# Altium PCB Kasli-DIOT.PCBDOC (part 14 of 23)
Units mm, origin at the board's own origin, x right, y up, seen from the top; angles counter-clockwise.
Board outline 222.9 x 100 mm, 10 copper layers (TopLayer, Layer 2, Layer 3, Layer 4, Layer 5, Layer 6, Layer 7, layer 8, Layer 9, BottomLayer), stack 1.564 mm thick; 977 components, 900 nets, 4676 pads, 2725 vias.
Unrouted connection lines stored in the file: 17.
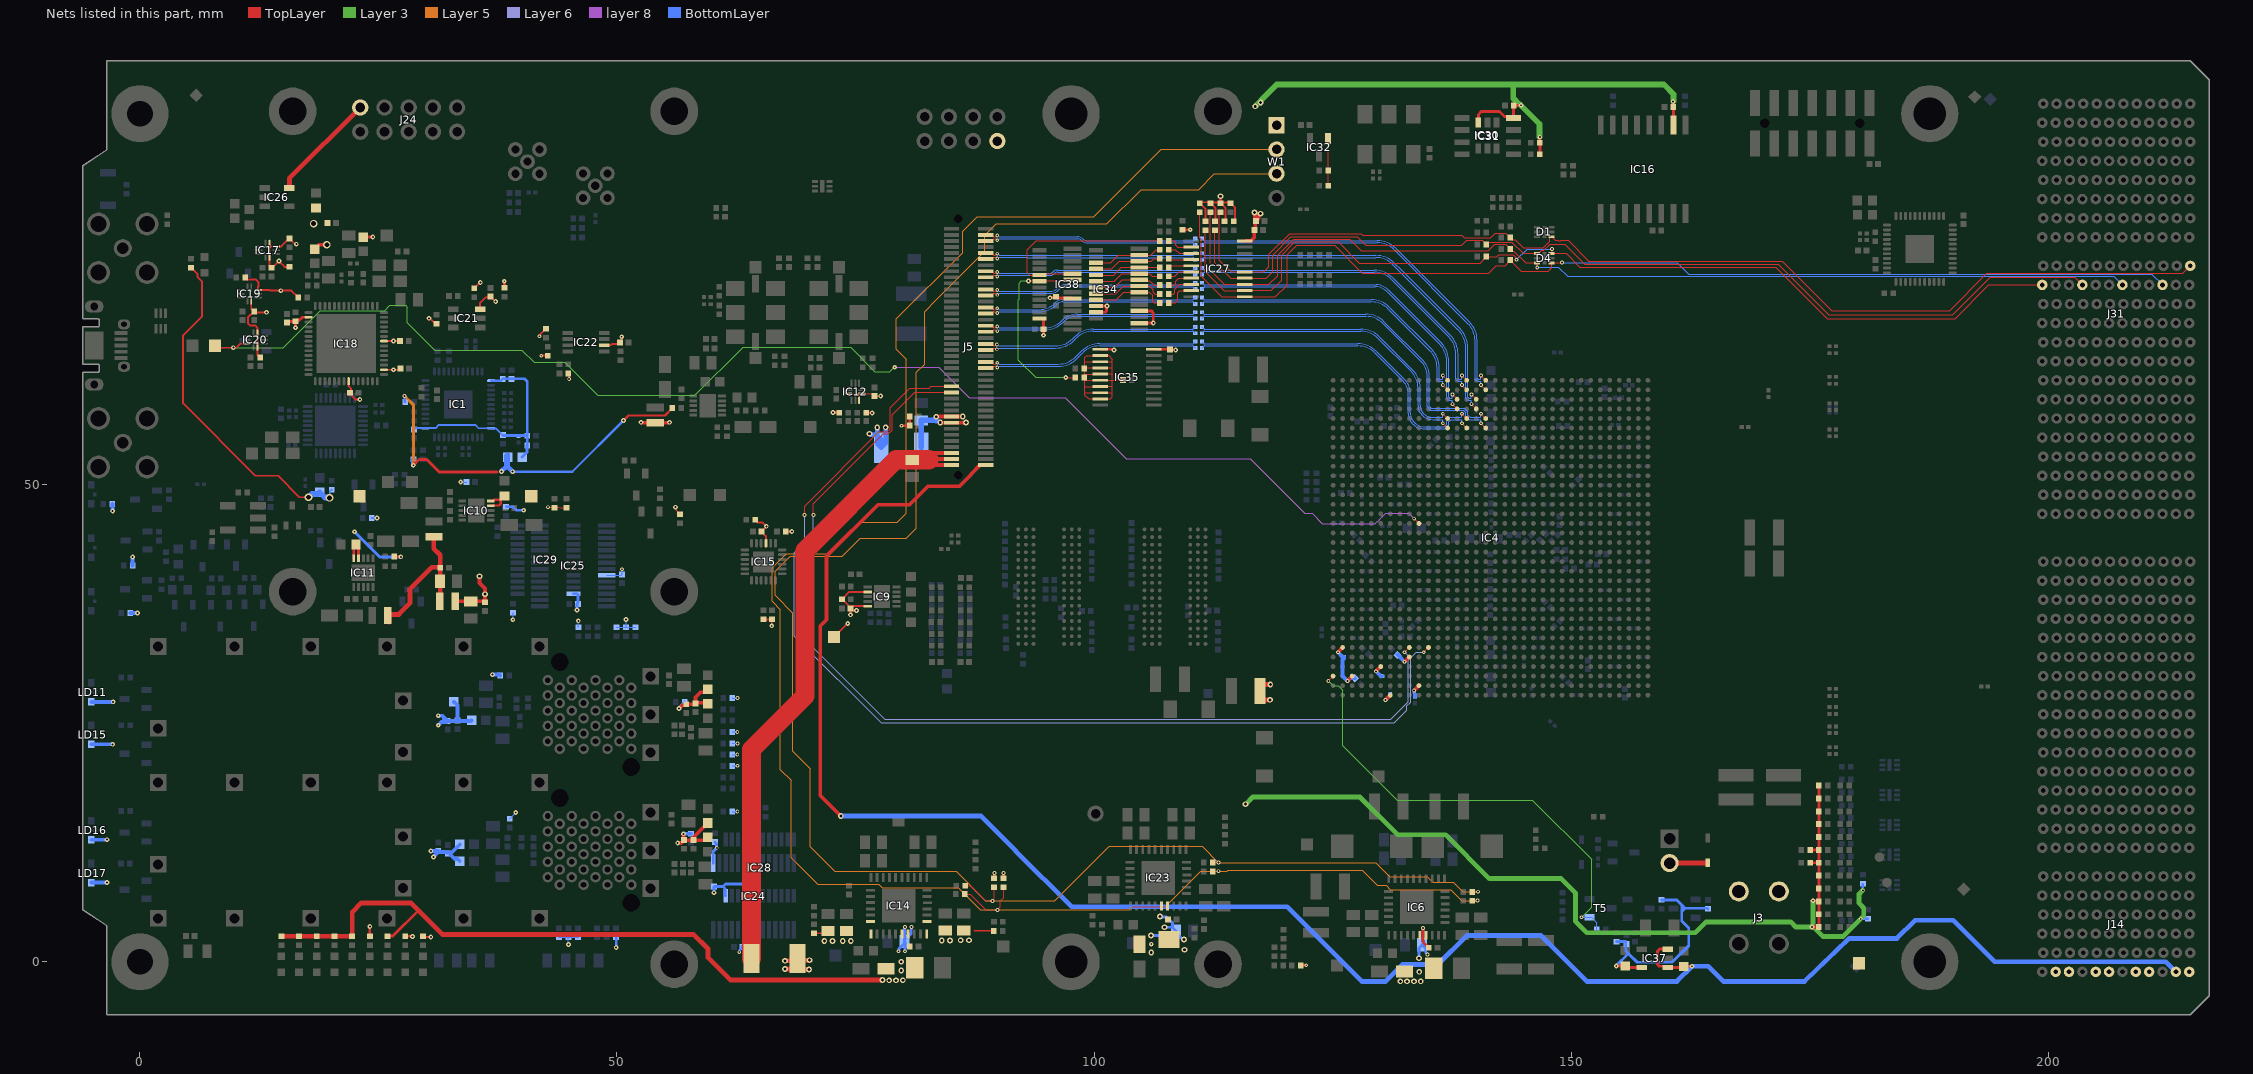
[diagram p20: the nets of this part, all layers, seen from the top]

## Via types
v1: diameter 0.4, hole 0.2, TopLayer to BottomLayer, tented both sides, 1723 vias
v2: diameter 0.5, hole 0.2, TopLayer to BottomLayer, tented both sides, 524 vias
v3: diameter 0.6, hole 0.3, TopLayer to BottomLayer, tented both sides, 172 vias
v4: diameter 0.6, hole 0.3, TopLayer to BottomLayer, 113 vias
v5: diameter 0.5, hole 0.2, TopLayer to BottomLayer, 107 vias
v6: diameter 0.4, hole 0.2, TopLayer to BottomLayer, 67 vias
v7: diameter 0.5, hole 0.25, TopLayer to BottomLayer, tented both sides, 12 vias
v8: diameter 0.8, hole 0.5, TopLayer to BottomLayer, tented both sides, 7 vias

## Nets (pads, with @x,y where several pads share a name; then routed paths per layer and width w, separated by ;. In a path a pad name is that pad's centre, name@x,y a point inside that pad or via, vN(x,y) a via of type N, cw(c..) or ccw(c..) an arc to the next point about the centre after c; other vN are vias at no path point) (continued)
P3V3: C28.2 C96.2 C109.2 C160.2 C161.2 C172.2 C178.2 C185.2 C186.2 C192.2 C193.2 C197.2 C198.2 C221.2 C227.2 C244.2 C259.2 C266.2 C267.2 C276.2 C292.2 C298.2 C305.2 C306.2 C307.2 C312.2 C315.2 C316.2 C317.2 C318.2 C389.2 C390.2 C427.2 F4.1 IC4.AJ2 IC4.AK9 IC4.AL6 IC4.AM3 IC4.AN10 IC4.AP7 IC9.7 IC9.10 IC12.1 IC12.7 IC12.10 IC14.22 IC14.23 IC15.21 IC16.2 IC22.2 IC24.9 IC24.15 IC25.9 IC27.20 IC28.21 IC28.24 IC29.24 IC30.6 IC31.8 IC34.9 IC34.16 IC34.18 IC35.1 IC35.20 IC38.2 IC38.3 IC38.24 L3.1 L19.1 L20.1 L21.1 L30.1 L31.1 L32.1 L33.1 L34.1 LD11.2 LD15.2 LD16.2 LD17.2 R11.2 R20.2 R44.2 R55.2 R62.2 R66.2 R73.2 R75.2 R76.2 R77.2 R78.2 R79.2 R81.2 R83.2 R84.2 R85.2 R87.2 R92.2 R127.2 R131.1 R132.1 R133.2 R134.2 R135.2 R136.2 R137.2 R138.2 R144.2 R145.2 R148.2 R149.2 R151.2 R158.2 R159.2 R174.2 R176.2 R177.2 R178.2 R179.2 R180.2 R181.2 R182.2 R183.2 R184.2 R185.2 R186.2 R187.2 R188.2 R189.2 R190.2 R191.2 R192.2 R209.2 R212.2 R217.2 R218.2 R219.2 R225.2 R226.2 R244.2 R245.2 R264.2 R265.2 R293.2 R294.2 R295.2 R296.2 R297.2 R300.2 TP7.1 TP31.1 W1.1 | length 322.7
  TopLayer w0.125: v1(42.765,47.653) 43.445,47.653 43.461,47.669 43.897,47.669 43.986,47.58 R190.2@44.686,47.58 ; v2(56.139,47.654) 56.189,47.603 56.189,47.335 56.36,47.164 56.36,47.144 56.587,46.917 R151.2@56.607,46.917 ; IC12.7@74.286,59.55 IC12.1@75.421,59.55 ; IC12.10@75.386,58.85 75.386,59.515 IC12.1@75.421,59.55 ; v2(77.638,59.302) 77.234,59.302 76.986,59.55 IC12.1@75.636,59.55 IC12.1@75.421,59.55
  TopLayer w0.15: R62.2@70.638,3.01 C390.2@71.888,3.01
  TopLayer w0.2: IC22.2@48.661,64.625 49.355,64.625 49.492,64.762 50.223,64.762 50.492,65.031 v2@50.492,65.467 ; R148.2@64.471,46.341 64.471,46.321 64.661,46.131 64.696,46.131 64.778,46.048 65.254,46.048 v5(65.656,45.645) 65.656,45.609 C198.2@65.139,45.092 65.611,44.619 IC15.21@65.611,43.879 IC15.21@65.63,43.898 ; R176.2@65.375,35.897 R177.2@66.261,35.897 66.22,35.856 v2(66.22,35.221) ; R149.2@67.712,45.084 67.729,45.101 v2(68.326,45.101) ; C390.2@71.888,3.01 C390.2@72.113,3.235 ; TP7.1@72.74,34.035 74.155,35.45 v5(74.186,35.45) ; v2(74.479,36.367) 74.479,37.023 C172.2@74.48,37.025 ; v2@75.153,36.867 v2(75.11,36.823) 74.682,36.823 C172.2@74.48,37.025 ; IC9.10@76.28,37.275 76.248,37.308 74.763,37.308 C172.2@74.48,37.025 ; IC9.7@76.28,38.775 74.36,38.775 R127.2@73.585,38 74.48,37.105 C172.2@74.48,37.025 ; R192.2@111.684,77.629 111.684,78.954 111.105,79.533 R212.2@111.085,79.533 111.166,79.614 112.113,79.614 R191.2@112.194,79.533 112.26,79.599 113.179,79.599 R181.2@113.245,79.533 ; R191.2@112.214,79.533 112.731,79.016 112.731,77.688 R182.2@112.672,77.629 ; R180.2@113.659,77.629 113.769,77.739 113.769,79.044 113.47,79.343 113.435,79.343 R181.2@113.245,79.533 ; R178.2@114.647,77.629 114.796,77.778 114.796,79.043 114.306,79.533 R179.2@114.286,79.533 114.21,79.609 113.322,79.609 R181.2@113.245,79.533
  TopLayer w0.25: R87.2@24.094,2.667 v2(24.094,3.705) ; R55.2@27.805,2.667 v2(28.573,2.667) ; R44.2@29.661,2.667 29.728,2.6 v2(30.486,2.6) ; R297.2@109.288,76.726 110.08,76.726 v2(110.087,76.733)
  TopLayer w0.254: v2(72.636,57.575) 72.648,57.563 73.279,57.563 R244.2@73.291,57.55 ; R245.2@76.094,57.563 R245.2@76.106,57.55 76.736,57.55 v2(76.749,57.538) ; v1(79.814,56.189) 79.819,56.194 80.685,56.194 R66.2@80.691,56.2 R225.2@80.691,57.14 ; IC35.1@100.661,64.204 101.965,64.204 102.036,64.133 v2(102.103,64.133) ; IC35.20@106.411,64.203 C186.2@107.962,64.203 ; C186.2@107.962,64.203 107.993,64.171 108.53,64.171 v2(108.561,64.14)
  TopLayer w0.3: R159.2@89.536,8.775 89.55,8.789 89.55,9.286 v1(89.563,9.3) ; v1(90.513,9.3) 90.522,9.292 90.522,8.783 R158.2@90.53,8.775 ; IC38.24@94.297,67.436 94.617,67.436 94.692,67.361 C192.2@94.692,66.302 94.693,66.301 v2(94.694,65.681) v2(94.694,65.681) ; v2@95.311,69.636 95.347,69.636 v2(95.381,69.602) 95.419,69.64 95.962,69.64 C427.2@96.035,69.713 96.171,69.576 97.707,69.576 IC34.9@97.747,69.536 ; IC38.2@100.197,68.086 101.173,68.086 101.311,68.223 101.311,68.704 v2@101.345,68.739 ; IC38.3@100.197,68.736 100.201,68.739 v2@101.345,68.739 ; v2(101.349,68.743) v2@101.345,68.739 ; IC34.16@104.747,66.936 104.758,66.946 106.206,66.946 v2(106.216,66.956) 106.216,68.019 105.999,68.236 IC34.18@104.747,68.236 ; R181.2@113.245,79.533 113.252,79.54 113.252,80.245 v3(113.258,80.251) ; IC30.6@140.286,87.975 140.286,88.828 140.59,89.132 142.516,89.132 143.043,88.605 143.811,88.605 IC31.8@143.961,88.455 143.982,88.476 143.982,89.614 143.878,89.719 C307.2@143.856,89.719 ; C307.2@143.877,89.774 143.883,89.781 v2(144.761,89.781) ; R264.2@146.731,84.65 v2(146.732,86.438) ; v2(160.71,90.172) 160.714,90.168 160.714,89.59 160.727,89.577 160.727,87.734 IC16.2@160.736,87.725 ; R295.2@175.074,10.383 R79.2@175.986,10.383 ; R296.2@175.081,11.731 R73.2@175.986,11.731 ; v2(175.261,3.65) 175.266,3.645 175.981,3.645 R78.2@175.986,3.641 R75.2@175.986,6.338 ; v5(175.361,6.4) 175.38,6.381 175.943,6.381 R75.2@175.986,6.338 ; R85.2@175.986,18.473 R92.2@175.986,17.124 R83.2@175.986,15.776 R84.2@175.986,14.428 R77.2@175.986,13.079 R73.2@175.986,11.731 ; R75.2@175.986,6.338 R76.2@175.986,7.686 R81.2@175.986,9.034 R79.2@175.986,10.383 ; R79.2@175.986,10.383 R73.2@175.986,11.731
  TopLayer w0.4: v2(52.511,56.55) 52.538,56.55 52.588,56.5 L3.1@54.011,56.5 55.434,56.5 55.484,56.55 v2(55.511,56.55) ; v2(56.361,12.45) 56.38,12.469 56.73,12.469 C244.2@57.011,12.75 ; v2(56.511,26.55) 56.851,26.89 57.151,26.89 C259.2@57.261,27 57.961,27 C276.2@58.186,27.225 ; v2(56.965,13.418) 56.984,13.399 56.984,12.777 C244.2@57.011,12.75 ; C160.2@58.011,12.65 C160.2@58.011,12.75 ; C276.2@58.235,27.093 58.235,27.727 58.76,28.252 59.213,28.252 L31.1@59.511,28.55 ; C276.2@58.261,27.15 59.411,27.15 L30.1@59.511,27.05 ; L19.1@59.511,13.05 59.211,12.75 C160.2@58.011,12.75 ; L34.1@59.511,14.55 58.011,13.05 C160.2@58.011,12.75 ; IC27.20@115.947,75.561 116.447,75.561 116.796,75.909 116.796,76.658 116.91,76.772 116.91,77.61 116.947,77.61 C292.2@116.975,77.638 ; v3(116.832,78.536) 116.87,78.498 116.87,77.742 C292.2@116.975,77.638 ; v3(117.461,78.421) 117.336,78.421 117.265,78.35 117.265,77.928 C292.2@116.975,77.638 ; v1(125.561,32.45) IC4.AJ2@126.061,32.95 ; v1(126.561,29.45) IC4.AM3@127.061,29.95 ; v1(129.561,30.45) IC4.AL6@130.061,30.95 ; v1(130.561,27.45) IC4.AP7@131.061,27.95 ; v1(132.561,31.45) IC4.AK9@133.061,31.95 ; v1(133.561,28.45) IC4.AN10@134.061,28.95 ; C244.2@57.011,12.75 C160.2@58.011,12.75
  TopLayer w0.5: C312.2@117.661,27.802 117.661,27.53 117.736,27.455 v3(118.436,27.455) ; C312.2@117.661,28.652 117.661,28.994 117.736,29.068 v3(118.482,29.068)
  Layer 3 w0.5: v3(115.886,16.525) 116.636,17.275 127.875,17.275 131.825,13.325 136.848,13.325 141.443,8.73 148.961,8.73 150.464,7.228 150.464,4.257 151.673,3.047 163.028,3.047 164.156,4.175 173.03,4.175 173.555,3.65 v2(175.261,3.65) 175.425,3.65 176.411,2.664 178.527,2.664 v1@180.369,4.506 ; v2@175.261,3.677 175.361,3.777 v5(175.361,6.4) ; v1(180.372,4.506) 180.695,4.829 180.695,5.641 180.199,6.138 180.199,7.108 v1(180.586,7.495)
  Layer 3 w0.6: v3(116.903,89.67) 116.916,89.67 117.307,90.061 v3(117.464,90.061) 117.464,90.253 119.161,91.95 143.941,91.95 ; v2(146.732,86.438) 146.694,86.476 146.694,87.81 144.644,89.86 144.601,89.86 143.941,90.52 143.941,91.95 ; v2(160.71,90.172) 160.737,90.199 160.737,90.947 159.734,91.95 143.941,91.95
  BottomLayer w0.095: v2(33.621,50.29) C298.2@34.271,50.29
  BottomLayer w0.125: R174.2@38.761,15.02 v2(39.391,15.65) ; v2(39.08,35.86) 39.116,35.895 R132.1@39.116,36.61 ; R187.2@43.913,2.585 R144.2@44.913,2.585 ; v2(44.913,1.805) R144.2@44.913,2.585 ; R188.2@45.913,2.585 R144.2@44.913,2.585 ; R138.2@45.947,35.065 v2(45.947,35.745) ; IC25.9@48.908,40.525 50.445,40.525 C227.2@50.52,40.6 50.536,40.616 v1(50.536,41.15) ; R186.2@49.947,35.065 R133.2@50.947,35.065 ; v2(50.947,35.87) R133.2@50.947,35.065 ; R185.2@51.947,35.065 R133.2@50.947,35.065 ; R217.2@62.076,15.776 62.102,15.75 v1(62.611,15.75) ; R145.2@62.076,20.528 62.102,20.553 v1(62.622,20.553) ; R183.2@62.076,21.716 62.085,21.725 v1(62.611,21.725) ; R134.2@62.076,22.904 62.08,22.9 v1(62.636,22.9) ; R184.2@62.076,24.092 62.084,24.1 v1(62.611,24.1) ; R135.2@62.076,27.656 62.082,27.65 v1(62.636,27.65)
  BottomLayer w0.2: R209.2@24.281,46.5 24.306,46.525 v5(24.836,46.525)
  BottomLayer w0.25: v2(49.913,1.509) R218.2@49.913,2.585 ; v1(180.372,4.506) 181.097,4.506 R293.2@181.111,4.519 ; v1(180.586,7.495) R294.2@180.586,8.163
  BottomLayer w0.254: v1(62.811,1.009) 62.839,1.037 62.839,1.256 63.091,1.509 63.091,1.63 63.213,1.63 63.335,1.752 63.335,1.9 63.336,1.901 IC24.9@63.336,3.35
  BottomLayer w0.3: IC29.24@45.458,38.575 45.823,38.575 45.898,38.5 C305.2@45.898,37.717 ; v2(45.798,36.867) C305.2@45.798,37.517 ; v2(56.511,26.55) 56.549,26.588 56.549,26.693 57.086,27.23 R136.2@57.086,27.25 ; IC24.15@60.086,10.35 60.086,11.575 v1(60.461,11.95) 60.461,11.977 60.411,12.027 60.411,12.419 60.271,12.559 R131.1@60.263,12.559 ; v2(60.161,7.25) 60.174,7.263 60.174,7.863 C306.2@60.186,7.875 ; C306.2@60.186,7.9 61.111,7.9 ; IC28.24@61.386,6.925 61.311,7 61.311,7.7 61.111,7.9 ; IC28.21@63.336,6.925 63.33,6.931 63.33,7.906 63.066,8.17 61.381,8.17 61.111,7.9
  BottomLayer w0.4: LD17.2@-5.1,8.3 v2(-3.464,8.3) ; LD16.2@-5.1,12.8 v2(-3.464,12.8) ; LD15.2@-5.1,22.8 v2(-2.864,22.8) ; LD11.2@-5.1,27.25 v2(-2.814,27.25) ; R20.2@-2.898,48.002 -2.897,48.001 -2.897,47.311 -2.865,47.28 v2(-2.865,47.253) ; R226.2@-1.019,36.55 v2(-0.264,36.55) ; R11.2@-0.769,41.55 v2(-0.769,42.42) ; v2(30.486,11.625) 30.513,11.625 30.538,11.6 C267.2@31.261,11.6 ; v2(30.761,11) 31.151,11.39 31.151,11.49 C267.2@31.261,11.6 ; v2(31.261,24.8) 31.601,25.14 31.801,25.14 ; v2(31.261,25.8) 31.711,25.8 C178.2@32.261,25.25 ; 31.861,25.55 31.861,25.2 31.801,25.14 ; C266.2@32.261,11.46 32.151,11.46 32.116,11.495 31.366,11.495 C267.2@31.261,11.6 ; C266.2@32.261,11.475 32.686,11.475 L32.1@33.511,12.3 ; C266.2@32.542,11.475 32.542,11.228 32.995,10.775 33.286,10.775 L33.1@33.511,10.55 ; L20.1@32.911,27.25 33.274,26.887 C185.2@33.274,25.288 ; L21.1@34.761,25.3 34.711,25.25 C178.2@32.261,25.25 ; v2(36.961,30.1) 37.681,30.1 R137.2@37.761,30.02 ; v2@56.938,13.418 v2(56.965,13.418) 56.966,13.417 R219.2@57.761,13.416 R219.2@57.761,13.416 ; v1(125.561,32.45) 126.061,31.95 C318.2@126.186,31.95 ; C318.2@126.211,31.95 126.211,31.807 126.061,31.657 126.061,29.95 v1(126.561,29.45) 126.829,29.718 C96.2@127.343,29.718 ; v1(129.561,30.45) 130.086,29.925 C316.2@130.211,29.925 ; v1(130.561,27.45) 131.036,27.925 C315.2@131.036,28.05 ; C109.2@131.796,32.215 v1(132.561,31.45) ; v1(133.561,28.45) 133.561,28.153 133.661,28.053 C317.2@133.661,27.8 ; 31.801,25.14 32.151,25.14 C178.2@32.261,25.25
  BottomLayer w0.5: v4(76.461,55.35) 76.488,55.35 76.588,55.25 77.186,55.25 F4.1@77.286,55.15 ; v4(77.286,56) F4.1@77.286,55.15 ; v4(78.161,56.025) 78.161,54.375 F4.1@77.686,53.9 ; F4.1@77.286,55.15 77.286,54.3 F4.1@77.686,53.9 ; F4.1@77.286,55.15 77.686,54.75 F4.1@77.686,53.9
  other v2: 50.492,65.517
  other v3: 71.735,2.175 72.585,2.175 73.66,2.175 74.51,2.175
P3V3_ADCLK: C190.2 C191.2 C234.2 C239.2 C241.2 C242.2 C243.2 IC1.12 IC1.34 IC1.44 L29.1 | length 24.6
  BottomLayer w0.2: C191.2@28.736,55.8 28.883,55.947 30.983,55.947 31.311,56.275 35.136,56.275 35.483,55.928 IC1.44@36.811,55.928 36.818,55.921 37.315,55.921 C190.2@38.036,55.2
  BottomLayer w0.254: IC1.34@36.811,60.928 37.837,60.928 C243.2@38.021,61.112
  BottomLayer w0.3: C243.2@38.021,61.112 C234.2@38.961,61.112 40.299,61.112 40.596,60.815 C239.2@40.596,55.142 ; C190.2@38.036,55.2 38.065,55.171 40.567,55.171 C239.2@40.596,55.142 ; L29.1@40.061,52.9 40.578,53.417 C241.2@40.578,54.19 ; C241.2@40.596,54.208 C239.2@40.596,55.142
P3V3_fused: C425.2 F4.2 J5.64 J5.66 | length 9.9
  TopLayer w0.4: v4(83.47,57.14) 83.477,57.148 J5.64@85.061,57.148 86.234,57.148 v4(86.236,57.15) ; v4(83.886,56.525) 83.898,56.513 J5.66@85.061,56.513 86.573,56.513 v4(86.586,56.525)
  BottomLayer w0.6: F4.2@81.886,53.9 C425.2@81.886,56.75 81.898,56.763 83.424,56.763 83.461,56.725
P3V3_LDO1: C17.2 IC11.9 IC11.10 L2.2 R15.2 R22.1 R250.2 TP20.1 | length 45.8
  TopLayer w0.2: R15.2@5.355,72.746 5.375,72.746 6.038,72.083 6.038,71.773 6.511,71.3 6.511,67.669 4.511,65.669 4.511,58.54 12.101,50.95 14.468,50.95 16.718,48.7 v8@17.281,48.7
  TopLayer w0.3: IC11.10@22.411,42.287 22.411,43.495 C17.2@22.656,43.74 ; C17.2@22.563,43.74 22.888,43.365 22.888,43.244 ccw(c22.967,43.245) 22.911,43.189 22.911,42.537 IC11.9@22.911,42.287 ; R250.2@26.634,42.465 26.642,42.458 27.333,42.458 v2(27.341,42.45)
  BottomLayer w0.2: v8(19.861,48.625) 19.892,48.656 19.892,49.316 20.082,49.506 R22.1@20.102,49.506
  BottomLayer w0.3: v2(22.483,45.084) 25.117,42.45 v2(27.341,42.45)
  BottomLayer w0.6: v8(17.661,48.7) 17.715,48.7 18.041,49.026 18.632,49.026 L2.2@18.832,49.226 19.395,48.663 19.823,48.663 v8(19.861,48.625)
P3V3_LDO2: C279.2 IC10.9 IC10.10 L29.2 R4.2 R54.1 R242.2 R254.2 TP25.1 | length 46.6
  TopLayer w0.25: IC10.9@36.761,47.8 36.786,47.825 37.639,47.825 37.797,47.983 37.797,48.442 37.153,48.442 37.011,48.3 IC10.10@36.761,48.3 ; v2(50.686,56.75) 51.196,57.26 55.021,57.26 55.791,58.03 R54.1@55.791,58.05
  TopLayer w0.3: v2(28.652,52.051) 29.251,52.65 30.061,52.65 31.361,51.35 37.43,51.35
  Layer 5 w0.3: v1(27.736,59.3) 28.652,58.384 v2(28.652,52.051)
  BottomLayer w0.25: v1(27.736,59.3) 27.764,59.272 27.764,58.703 R4.2@27.791,58.675 ; R254.2@38.386,47.695 38.397,47.684 39.116,47.684 39.448,47.352 40.203,47.352 v2(40.221,47.334) ; v2(39.061,51.375) 45.311,51.375 v2(50.686,56.75)
  BottomLayer w0.5: v2(28.652,52.051) 28.652,52.671 R242.2@28.661,52.68 ; v2(37.886,51.4) 38.386,51.9 38.386,53.025 38.511,53.15 38.536,53.125 38.536,51.9 v2(39.061,51.375)
P3V3_MP: C397.2 C420.2 IC37.5 R93.2 R258.2 R259.2 | length 24.6
  TopLayer w0.3: v2(154.742,-0.435) C420.2@155.671,-0.435 155.821,-0.585 IC37.5@157.421,-0.585
  BottomLayer w0.3: v2@154.742,-0.409 155.976,0.825 ; R93.2@154.771,2.129 155.726,2.129 155.736,2.139 155.736,1.15 156.018,0.868 156.146,0.74 156.936,-0.05 160.597,-0.05 162.336,1.689 162.336,3.556 161.614,4.278 161.614,5.27 ; R259.2@159.486,6.495 161.083,6.495 161.614,5.964 ; R258.2@164.341,5.538 164.262,5.617 161.961,5.617 ; 161.614,5.27 161.961,5.617 ; 161.614,5.27 161.614,5.964 ; 161.614,5.964 161.961,5.617
P3V3_USB: C205.2 C213.2 C214.2 C215.2 C216.2 C222.2 C223.2 C224.2 C293.2 C409.2 IC17.1 IC17.7 IC17.10 IC18.16 IC18.36 IC18.44 IC18.50 IC19.7 IC19.10 IC20.1 IC20.7 IC21.6 IC26.5 J24.9 L24.1 L25.1 R194.2 R195.2 R196.2 R197.2 R198.2 R202.2 R203.2 R204.2 R206.2 R207.2 R241.1 | length 55.5
  TopLayer w0.2: R194.2@11.031,71.75 11.031,71.73 11.221,71.54 11.298,71.54 11.338,71.5 12.161,71.5 12.411,71.25 12.411,70.784 12.366,70.739 IC19.10@12.366,70.415 13.598,70.415 13.663,70.35 v2(14.761,70.35) 15.868,70.35 R197.2@16.584,69.634 ; IC19.7@11.666,69.315 11.666,68.387 C215.2@11.974,68.079 ; C214.2@12.609,63.253 12.301,63.561 IC20.7@12.301,64.489 IC20.1@12.301,65.839 12.301,66.46 12.061,66.7 11.52,66.7 11.334,66.886 11.334,67.581 11.428,67.675 11.428,67.699 11.545,67.816 11.613,67.816 11.764,67.967 11.764,67.969 11.874,68.079 C215.2@11.974,68.079 ; v2(13.26,68.079) C215.2@11.974,68.079 ; IC17.1@13.571,75.237 IC17.7@13.571,73.887 13.571,72.959 C293.2@13.783,72.748 ; IC17.1@13.59,74.987 IC17.10@14.271,74.987 14.825,74.987 R195.2@15.657,75.819 16.34,75.136 16.386,75.183 v2(16.386,75.225) ; C293.2@13.786,72.751 13.996,72.961 14.072,72.961 v2(14.561,73.45) 15.164,72.847 R196.2@15.657,72.847 ; IC18.36@21.876,60.858 21.876,60.335 22.111,60.1 22.111,59.55 22.221,59.44 22.221,59.34 22.625,58.936 v2(23.042,58.936) ; IC18.44@25.576,62.058 v2(26.579,62.058) C224.2@27.328,62.058 ; IC18.50@25.576,65.058 26.575,65.058 v2(26.579,65.062) C222.2@27.372,65.062 ; v2@30.342,67.506 R202.2@31.014,66.833 ; R203.2@35.036,70.52 35.036,70.6 35.645,71.209 v2(35.678,71.209) ; IC21.6@35.661,68.4 35.631,68.43 35.631,69.04 36.247,69.656 36.646,69.656 C216.2@36.74,69.75 37.278,69.212 v2(37.283,69.212) ; v1(41.861,65.575) 41.861,65.651 42.555,66.345 R206.2@42.575,66.345 R206.2@42.545,66.375 ; v1(42.061,63.525) 42.074,63.538 42.733,63.538 R207.2@42.746,63.551 ; R241.1@44.913,61.683 44.95,61.647 44.95,61.136 v1(44.986,61.1)
  TopLayer w0.3: C223.2@15.403,67.125 16.285,67.125 R198.2@16.292,67.132 ; v2(16.292,66.459) R198.2@16.292,67.132 ; IC18.16@17.676,67.558 17.019,67.558 16.733,67.272 16.432,67.272 R198.2@16.292,67.132 ; L24.1@23.404,75.972 v2(24.408,75.972) ; v2(38.181,71.34) 38.196,71.325 38.196,70.627 R204.2@38.211,70.612
  TopLayer w0.4: v8(19.592,75.161) 18.735,75.161 L25.1@18.324,74.75 ; L25.1@18.324,74.75 18.276,74.75 L25.1@18.324,74.702 L25.1@18.324,74.75
  TopLayer w0.5: IC26.5@15.661,81.1 15.661,82.121 J24.9@23.088,89.548
  other v2: 30.286,67.45
  other v8: 18.197,77.381
P5V0_CLK: C3.2 C199.2 C383.2 C384.2 IC14.1 IC14.32 L1.1 R156.2 | length 8.1
  TopLayer w0.15: 87.461,3.3 87.511,3.25 R156.2@89.491,3.25
  TopLayer w0.4: L1.1@33.036,37.788 C3.2@34.661,37.788 36.229,37.788 36.171,37.788 36.161,37.798 36.161,39.125 35.593,39.693 v3@35.593,40.356
  other v3: 84.04,2.241 84.901,2.241 86.018,2.26 86.905,2.26 36.161,38.537 35.591,40.417
P5V0_CLKa: C18.2 C38.2 L1.2 L23.1 L35.1 | length 16.3
  TopLayer w0.5: L23.1@25.83,36.418 27.14,36.418 28.298,37.576 28.298,39.075 30.593,41.37 C38.2@31.41,41.37 ; L23.1@25.961,36.287 26.111,36.137 L23.1@26.111,35.625 ; L35.1@30.802,44.55 30.802,43.309 31.47,42.641 C38.2@31.47,41.31 ; L1.2@31.471,37.788 C38.2@31.471,41.34
P5V0_MP: C419.2 IC37.1 IC37.3 J5.79 J14.B1 | length 212.7
  TopLayer w0.3: IC37.3@160.121,1.331 159.3,1.331 159.071,1.102 159.071,-0.284 159.247,-0.46 159.996,-0.46 IC37.1@160.121,-0.585 161.682,-0.585 C419.2@161.794,-0.473 161.803,-0.464 v2(162.688,-0.464)
  TopLayer w0.4: v3(73.461,15.275) 71.311,17.425 71.311,35.2 71.961,35.85 71.961,42.528 77.346,47.913 80.674,47.913 82.611,49.85 85.889,49.85 87.098,51.059 87.098,51.105 88.061,52.068 J5.79@88.661,52.068
  BottomLayer w0.5: v3(73.461,15.275) 88.181,15.275 91.765,11.691 91.765,11.66 97.649,5.775 120.236,5.775 128.061,-2.05 130.572,-2.05 132.34,-0.282 136.043,-0.282 139.075,2.75 146.861,2.75 151.661,-2.05 161.103,-2.05 v2(162.688,-0.464) 164.364,-0.464 165.95,-2.05 174.476,-2.05 179.183,2.45 184.158,2.45 186.058,4.35 190.042,4.35 194.392,0 212.35,0 J14.B1@213.4,-1.05
P12V0: C22.2 C27.2 C30.1 C32.1 C36.2 C40.2 C362.1 C363.1 C364.1 C365.1 C366.2 C367.2 D18.1 F3.1 IC6.28 IC6.29 IC14.28 IC14.29 IC23.28 IC23.29 J3.3 J3.4 J14.A1 J14.D1 J14.E1 J14.G1 J14.H1 J14.J1 J14.K1 J21.2 R14.2 R74.2 R86.2 R88.2 R89.2 R90.2 R91.2 TP6.1 | length 105.2
  TopLayer w0.254: R14.2@121.681,-0.35 121.685,-0.354 122.247,-0.354 v1(122.251,-0.358)
  TopLayer w0.3: R86.2@25.95,2.667 26.008,2.725 26.528,2.725 29.19,5.387 ; v1(134.473,3.531) 134.473,2.088 C36.2@135.086,1.475
  TopLayer w0.5: R89.2@14.817,2.667 14.809,2.675 R88.2@22.239,2.675 ; R88.2@22.239,2.667 22.239,5.214 23.2,6.175 28.402,6.175 29.19,5.387 31.702,2.875 58.018,2.875 59.55,1.343 59.55,0.441 61.908,-1.917 v3(77.823,-1.917) ; v4(67.611,-0.75) 68.311,-0.75 F3.1@68.911,-0.15 ; v4(67.611,0.1) 68.661,0.1 F3.1@68.911,0.35 ; v4(70.136,-0.8) 69.511,-0.8 68.911,-0.2 F3.1@68.911,-0.15 ; v4(70.186,0.175) 69.086,0.175 F3.1@68.911,0.35 ; J21.2@160.333,10.355 D18.1@164.336,10.355 ; F3.1@68.911,-0.15 F3.1@68.911,0.35
  BottomLayer w0.3: v1(79.511,1.108) 79.53,1.127 79.53,1.334 80.148,1.953 C22.2@80.148,2.128 ; v1(80.186,1.108) C22.2@80.186,2.09 ; v1(80.186,3.65) 80.186,3.623 80.148,3.585 C22.2@80.148,2.128 ; v1(80.861,3.65) 80.846,3.635 80.846,3 80.148,2.303 C22.2@80.148,2.128 ; v3(105.984,2.752) 108.215,2.752 108.59,3.127 C40.2@108.59,3.225 ; v3(106.911,4.759) 106.968,4.702 107.612,4.702 108.215,4.099 108.215,3.6 C40.2@108.59,3.225 ; v3(107.4,3.625) C40.2@108.215,3.625 ; v3(109.433,2.334) 109.306,2.334 108.59,3.05 C40.2@108.59,3.225 ; v3(134.056,0.368) 134.056,1.428 C27.2@134.404,1.775 ; v1(134.473,3.531) 134.468,3.526 134.468,1.839 C27.2@134.404,1.775 ; v1(134.948,0.776) 134.948,0.803 134.779,0.973 134.779,1.4 C27.2@134.404,1.775
  other v2: 105.999,1.852
  other v3: 132.111,-2.05 132.811,-2.05 133.536,-2.05 134.248,-2.05 78.523,-1.942 79.248,-1.942 79.961,-1.935 134.086,-1.05 79.798,-0.917 79.798,0.008 106,0.975 109.49,1.258
P12V0_fused: C424.2 F3.2 J5.76 J5.78 J5.80 | length 69.5
  TopLayer w0.4: 82.561,52.625 83.273,53.338 J5.76@85.061,53.338 ; 82.711,52.625 83.269,52.068 J5.80@85.061,52.068 ; 83.193,52.493 83.193,52.596 83.193,52.819 83.193,52.824 ; 83.299,52.596 83.458,52.596 83.564,52.703 J5.78@85.061,52.703
  TopLayer w2: F3.2@64.111,0.35 64.111,22.275 69.723,27.887 69.723,43.112 79.236,52.625 C424.2@80.936,52.625 82.711,52.625
PCIe_rst: IC4.AJ11 J5.54 | length 112.5
  TopLayer w0.127: v6(69.661,46.825) 69.661,47.753 77.445,55.537 77.774,55.537 77.799,55.562 78.353,55.562 78.624,55.833 78.624,56.387 78.624,58.061 80.697,60.134 82.715,60.134 82.904,60.323 J5.54@85.061,60.323 ; v1(134.561,32.45) IC4.AJ11@135.061,32.95
  Layer 6 w0.127: v6(69.661,46.825) 69.661,43.936 68.586,42.861 68.586,34.145 77.681,25.05 131.461,25.05 132.799,26.388 132.799,26.822 133.187,27.21 133.187,31.861 133.775,32.45 v1(134.561,32.45)
PCIe_Wake: IC4.AJ9 J5.56 | length 108.9
  TopLayer w0.127: v6(70.586,46.825) 70.586,48.028 77.893,55.335 78.447,55.335 78.851,55.739 78.851,57.35 81.188,59.688 J5.56@85.061,59.688 ; v1(132.561,32.45) IC4.AJ9@133.061,32.95
  Layer 6 w0.127: v6(70.586,46.825) 70.586,43.7 69.01,42.124 69.01,34.47 78.055,25.425 131.081,25.425 132.929,27.273 132.929,32.082 v1(132.561,32.45)
PWR_Cycle_REQ: IC4.AM1 R261.2 T5.1 | length 48.5
  TopLayer w0.127: v1(124.561,29.45) IC4.AM1@125.061,29.95
  Layer 3 w0.127: v1(124.561,29.45) 125.089,28.922 125.603,28.922 126.08,28.446 126.08,22.631 131.761,16.95 145.936,16.95 152.154,10.732 152.154,5.718 v1(151.111,4.675)
  BottomLayer w0.127: v1(151.111,4.675) T5.1@151.961,4.675 152.161,4.675 152.716,4.12 R261.2@152.716,3.375
PWR_SCL: R27.1 R51.1 R67.1 R159.1 W1.3 | length 197.2
  TopLayer w0.1: R67.1@112.461,10.411 113.025,10.411 v1(113.036,10.4) ; R27.1@139.661,7.336 139.675,7.35 v1(140.236,7.35)
  TopLayer w0.127: R51.1@86.464,7.95 87.086,7.95 88.649,6.387 v1(89.348,6.387) 89.565,6.604 R159.1@89.565,7.969
  Layer 5 w0.127: W1.3@119.371,82.61 112.621,82.61 110.961,80.95 104.936,80.95 101.336,77.35 89.776,77.35 88.561,76.135 88.561,74.475 83.719,69.634 83.715,69.634 83.473,69.391 83.473,69.387 82.246,68.16 82.246,62.645 81.372,61.772 81.372,45.437 80.311,44.375 75.486,44.375 73.597,42.486 68.163,42.486 66.592,40.915 66.592,38.406 68.436,36.562 68.436,22.075 70.261,20.25 70.261,12.05 72.836,9.475 85.536,9.475 88.624,6.387 v1(89.348,6.387) 95.877,6.387 101.603,12.114 111.323,12.114 v1(113.036,10.4) 129.511,10.4 130.986,8.925 134.908,8.925 135.483,8.35 137.661,8.35 138.661,7.35 v1(140.236,7.35)
PWR_SDA: R21.1 R48.1 R65.1 R158.1 W1.2 | length 202.2
  TopLayer w0.1: R65.1@112.461,9.483 112.478,9.5 v1(113.036,9.5) ; R21.1@139.661,6.404 139.682,6.425 v1(140.211,6.425)
  TopLayer w0.127: R48.1@86.423,7.075 87.011,7.075 88.649,5.437 v1(89.873,5.437) 90.186,5.75 90.186,6.375 90.53,6.719 R158.1@90.53,7.835
  Layer 5 w0.127: v1(89.873,5.437) 88.074,5.437 85.75,7.762 77.823,7.762 77.46,8.125 71.019,8.125 68.261,10.883 68.261,19.009 67.136,20.134 67.136,36.922 66.286,37.772 66.286,41.295 67.761,42.77 72.077,42.77 75.356,46.05 79.361,46.05 80.335,47.024 80.335,63.165 79.286,64.214 79.286,67.388 86.236,74.338 86.236,76.57 87.766,78.1 99.961,78.1 107.036,85.175 W1.2@119.168,85.175 ; v1@89.878,5.442 103.692,5.442 104.025,5.775 107.456,5.775 111.18,9.5 v1(113.036,9.5) 113.967,9.5 114.042,9.575 128.128,9.575 129.703,8 130.611,8 131.061,7.55 137.411,7.55 138.536,6.425 v1(140.211,6.425)
Reset_N: IC35.2 IC35.3 IC35.4 IC35.5 IC35.6 IC35.7 IC35.8 IC35.9 R231.2 R238.1 R240.2 | length 36.1
  TopLayer w0.127: IC35.9@99.927,59.022 101.732,59.022 101.927,59.217 101.927,59.676 ; IC35.8@99.927,59.672 101.923,59.672 101.927,59.676 ; IC35.7@99.927,60.295 99.065,60.295 99.039,60.321 ; IC35.7@99.927,60.322 101.848,60.322 101.927,60.401 ; IC35.5@99.927,61.595 99.05,61.595 99.039,61.584 ; IC35.5@99.927,61.622 101.847,61.622 101.927,61.542 ; IC35.3@99.927,62.895 99.043,62.895 99.039,62.891 ; IC35.3@99.927,62.922 101.927,62.922 ; IC35.2@99.927,63.572 101.525,63.572 101.927,63.17 101.927,62.922 ; IC35.9@101.039,58.995 99.441,58.995 99.039,59.397 99.039,59.645 ; IC35.8@101.039,59.645 99.039,59.645 ; IC35.2@101.039,63.545 99.234,63.545 99.039,63.35 99.039,62.891 ; R238.1@103.038,60.965 101.946,60.965 101.927,60.983 ; 99.039,59.645 99.039,60.321 ; 99.039,60.321 99.039,60.968 R231.2@99.039,61.025 ; R231.2@99.039,61.025 99.096,60.968 101.034,60.968 101.039,60.972 101.916,60.972 101.927,60.983 ; R231.2@99.039,61.025 99.039,61.584 ; 99.039,61.584 R240.2@99.039,62.222 ; R240.2@99.039,62.222 99.039,62.891 ; R240.2@99.039,62.222 99.062,62.245 101.011,62.245 101.039,62.272 101.901,62.272 101.927,62.246 ; 101.927,59.676 101.927,60.401 ; 101.927,60.401 101.927,60.983 ; 101.927,60.983 101.927,61.542 ; 101.927,61.542 101.927,62.246 ; 101.927,62.246 101.927,62.922
Reset_Nb: IC34.6 IC38.18 R231.1 | length 20.3
  TopLayer w0.127: v2(93.136,71.375) 94.258,71.375 IC38.18@94.297,71.336 94.374,71.412 97.674,71.412 IC34.6@97.747,71.486 ; v2@97.047,61.246 R231.1@98.023,61.246
  Layer 3 w0.127: v2(93.136,71.375) 92.398,71.375 92.148,71.125 92.148,69.469 92.064,69.386 92.064,63.074 93.882,61.256 v2@96.8,61.256
  other v2: 97.038,61.254
RESETn: IC32.1 R53.1 R61.1 | length 5
  TopLayer w0.127: IC32.1@124.536,86.3 124.556,86.28 R61.1@124.556,81.35
RxD_2V5: IC4.T10 IC20.5 TP16.1 | length 145.6
  TopLayer w0.095: v1(133.561,46.45) IC4.T10@134.061,45.95
  TopLayer w0.15: TP16.1@7.874,64.575 8.074,64.375 v2(9.786,64.375) 10.111,64.375 10.311,64.575 10.525,64.789 IC20.5@11.201,64.789
  Layer 3 w0.1: v2(9.786,64.375) 15.004,64.375 18.879,68.25 25.654,68.25 26.202,68.797 27.864,68.797 28.039,68.622 28.039,66.972 30.886,64.125 40.036,64.125 41.338,62.823 44.538,62.823 47.986,59.375 58.161,59.375 63.211,64.425 70.497,64.425 70.522,64.4 74.486,64.4 77.011,61.875 78.602,61.875 79.052,62.325 v2(79.111,62.325)
  layer 8 w0.095: v2(79.111,62.325) 83.736,62.325 86.936,59.125 96.986,59.125 103.399,52.713 116.373,52.713 122.086,47 122.861,47 123.936,45.925 129.485,45.925 129.663,46.103 129.705,46.103 129.908,46.306 129.908,46.348 130.56,47 133.011,47 v1(133.561,46.45)
S0_RX_N: C77.1 J5.39 | length 22.8
  TopLayer w0.095: J5.39@88.661,64.768 89.261,64.768 89.467,64.561 89.604,64.561 89.743,64.7 v6(89.811,64.7)
  BottomLayer w0.095: v6(89.811,64.7) 89.88,64.7 90.019,64.561 95.956,64.561 ccw(c95.956,67.101) 97.752,65.305 97.965,65.518 cw(c99.916,63.567) 97.967,65.52 cw(c99.916,63.567) 99.916,66.326 110.325,66.326 ccw(c110.325,66.476) 110.431,66.37 ccw(c110.402,66.399) 110.442,66.399 110.577,66.534 cw(c110.62,66.491) C77.1@110.62,66.551
S0_RX_P: C41.1 J5.41 | length 22.8
  TopLayer w0.095: J5.41@88.661,64.133 89.261,64.133 89.467,64.339 89.604,64.339 89.743,64.2 v6(89.811,64.2)
  BottomLayer w0.095: v6(89.811,64.2) 89.88,64.2 90.019,64.339 95.957,64.339 ccw(c95.957,67.098) 97.908,65.147 98.121,65.36 cw(c99.917,63.564) 99.917,66.104 110.325,66.104 cw(c110.325,65.955) 110.431,66.061 cw(c110.402,66.032) 110.442,66.032 110.577,65.897 ccw(c110.62,65.94) C41.1@110.62,65.879
S0_TX_N: C100.2 J5.27 | length 22.5
  TopLayer w0.095: J5.27@88.661,68.578 89.261,68.578 89.467,68.371 89.653,68.371 89.792,68.51 v6(89.861,68.51)
  BottomLayer w0.095: v6(89.861,68.51) 89.93,68.51 90.069,68.371 94.216,68.371 ccw(c94.216,70.911) 96.012,69.115 ; 96.013,69.116 cw(c96.733,68.395) 96.014,69.117 cw(c96.733,68.395) 96.733,69.414 110.325,69.414 ccw(c110.325,69.564) 110.431,69.458 ccw(c110.402,69.487) 110.442,69.487 110.577,69.621 cw(c110.62,69.579) C100.2@110.62,69.639
S0_TX_P: C54.2 J5.29 | length 22.5
  TopLayer w0.095: J5.29@88.661,67.943 89.261,67.943 89.467,68.149 89.653,68.149 89.792,68.01 v6(89.861,68.01)
  BottomLayer w0.095: v6(89.861,68.01) 89.93,68.01 90.069,68.149 94.217,68.149 ccw(c94.217,70.908) 96.168,68.957 ; 96.169,68.958 cw(c96.736,68.39) 96.736,69.192 110.325,69.192 cw(c110.325,69.043) 110.431,69.148 cw(c110.402,69.12) 110.442,69.12 110.577,68.985 ccw(c110.62,69.028) C54.2@110.62,68.967
S0C_RX_N: C77.2 IC4.E13 | length 31.9
  TopLayer w0.095: v1(136.561,57.45) IC4.E13@137.061,56.95
  BottomLayer w0.095: C77.2@111.32,66.551 cw(c111.32,66.491) 111.363,66.534 111.486,66.411 cw(c111.457,66.382) 111.497,66.382 111.525,66.354 ccw(c111.592,66.421) 111.592,66.326 127.968,66.326 cw(c127.968,63.571) 129.917,65.519 133.456,61.98 cw(c131.694,60.217) 134.187,60.217 134.187,58.364 ccw(c135.49,58.364) 134.568,57.443 ccw(c135.49,58.364) 135.49,57.061 136.505,57.061 136.561,57.117 v1(136.561,57.45)
S0C_RX_P: C41.2 IC4.F13 | length 31.9
  TopLayer w0.095: v1(136.561,56.45) IC4.F13@137.061,55.95
  BottomLayer w0.095: C41.2@111.32,65.879 ccw(c111.32,65.94) 111.363,65.897 111.486,66.02 ccw(c111.457,66.049) 111.497,66.049 111.525,66.077 cw(c111.592,66.009) 111.592,66.104 127.966,66.104 cw(c127.966,63.564) 129.762,65.36 133.234,61.888 cw(c131.472,60.125) 133.235,61.887 cw(c131.472,60.125) 133.965,60.125 133.965,58.272 ccw(c135.268,58.272) 134.346,57.351 134.411,57.286 ; 134.412,57.285 ccw(c135.49,58.364) 135.49,56.839 136.505,56.839 136.561,56.783 v1(136.561,56.45)
S0C_TX_N: C100.1 IC4.A13 | length 30.8
  TopLayer w0.095: v1(136.561,61.45) IC4.A13@137.061,60.95
  BottomLayer w0.095: C100.1@111.43,69.487 111.497,69.487 111.497,69.466 ccw(c111.548,69.466) 111.512,69.43 ; 111.512,69.43 111.525,69.417 ccw(c111.592,69.484) 111.592,69.389 129.055,69.389 cw(c129.055,66.633) 131.004,68.582 135.376,64.21 cw(c133.434,62.268) 135.377,64.209 cw(c133.434,62.268) 136.18,62.268 136.18,61.131 136.25,61.061 136.505,61.061 136.561,61.117 v1(136.561,61.45)
S0C_TX_P: C54.1 IC4.B13 | length 31
  TopLayer w0.095: v1(136.561,60.45) IC4.B13@137.061,59.95
  BottomLayer w0.095: C54.1@111.32,68.967 cw(c111.403,68.967) 111.344,69.026 111.485,69.167 129.053,69.167 cw(c129.053,66.627) 130.849,68.423 135.214,64.058 cw(c133.418,62.262) 135.958,62.262 135.958,61.039 136.158,60.839 136.505,60.839 136.561,60.783 v1(136.561,60.45)
S1_RX_N: C392.1 J5.45 | length 22.9
  TopLayer w0.095: J5.45@88.661,62.863 89.261,62.863 89.467,62.656 89.653,62.656 89.792,62.795 v6(89.861,62.795)
  BottomLayer w0.095: v6(89.861,62.795) 89.93,62.795 90.069,62.656 96.276,62.656 ccw(c96.276,65.196) 98.072,63.4 98.646,63.974 cw(c100.597,62.023) 98.648,63.976 cw(c100.597,62.023) 100.597,64.782 110.325,64.782 ccw(c110.325,64.932) 110.431,64.826 ccw(c110.402,64.855) 110.442,64.855 110.577,64.99 cw(c110.62,64.947) C392.1@110.62,65.007
S1_RX_P: C141.1 J5.47 | length 22.9
  TopLayer w0.095: J5.47@88.661,62.228 89.261,62.228 89.467,62.434 89.653,62.434 89.792,62.295 v6(89.861,62.295)
  BottomLayer w0.095: v6(89.861,62.295) 89.93,62.295 90.069,62.434 96.277,62.434 ccw(c96.277,65.193) 98.228,63.242 98.803,63.817 cw(c100.599,62.02) 100.599,64.56 110.325,64.56 cw(c110.325,64.411) 110.431,64.517 cw(c110.402,64.488) 110.442,64.488 110.577,64.353 ccw(c110.62,64.396) C141.1@110.62,64.336
S1_TX_N: C393.2 J5.21 | length 22.4
  TopLayer w0.095: J5.21@88.661,70.483 89.261,70.483 89.467,70.276 89.653,70.276 89.792,70.415 v6(89.861,70.415)
  BottomLayer w0.095: v6(89.861,70.415) 89.93,70.415 90.069,70.276 95.405,70.276 ccw(c95.405,71.287) 96.12,70.572 cw(c97.052,69.641) 97.052,70.958 110.325,70.958 ccw(c110.325,71.107) 110.431,71.002 ccw(c110.402,71.031) 110.442,71.031 110.577,71.165 cw(c110.62,71.123) C393.2@110.62,71.183
S1_TX_P: C157.2 J5.23 | length 22.4
  TopLayer w0.095: J5.23@88.661,69.848 89.261,69.848 89.467,70.054 89.653,70.054 89.792,69.915 v6(89.861,69.915)
  BottomLayer w0.095: v6(89.861,69.915) 89.93,69.915 90.069,70.054 95.408,70.054 ccw(c95.408,71.281) 96.275,70.413 96.277,70.415 cw(c97.052,69.64) 97.052,70.736 110.325,70.736 cw(c110.325,70.587) 110.431,70.692 cw(c110.402,70.664) 110.442,70.664 110.577,70.529 ccw(c110.62,70.571) C157.2@110.62,70.511
S1C_RX_N: C392.2 IC4.E15 | length 34.3
  TopLayer w0.095: v1(138.561,57.45) IC4.E15@139.061,56.95
  BottomLayer w0.095: C392.2@111.32,65.007 cw(c111.32,64.947) 111.363,64.99 111.486,64.867 cw(c111.457,64.838) 111.497,64.838 111.525,64.81 ccw(c111.592,64.877) 111.592,64.782 127.637,64.782 cw(c127.637,62.027) 129.586,63.975 132.625,60.936 cw(c131.331,59.642) 133.161,59.642 133.161,57.568 ccw(c134.654,57.568) 133.598,56.513 ccw(c134.654,57.568) 134.654,56.076 136.716,56.076 136.964,56.324 136.964,56.697 137.328,57.061 138.465,57.061 138.561,57.157 v1(138.561,57.45)
S1C_RX_P: C141.2 IC4.F15 | length 34.3
  TopLayer w0.095: v1(138.561,56.45) IC4.F15@139.061,55.95
  BottomLayer w0.095: C141.2@111.32,64.336 ccw(c111.32,64.396) 111.363,64.353 111.486,64.476 ccw(c111.457,64.505) 111.497,64.505 111.525,64.533 cw(c111.592,64.465) 111.592,64.56 127.634,64.56 cw(c127.634,62.02) 129.431,63.817 132.403,60.844 ; 132.404,60.843 cw(c131.109,59.55) 132.939,59.55 132.939,57.476 ccw(c134.432,57.476) 133.376,56.421 133.441,56.356 ccw(c134.654,57.568) 133.443,56.354 ccw(c134.654,57.568) 134.651,55.854 ccw(c134.654,57.568) 134.654,55.853 136.808,55.854 137.186,56.232 137.186,56.605 137.42,56.839 138.092,56.839 138.505,56.839 138.561,56.783 v1(138.561,56.45)
S1C_TX_N: C393.1 IC4.C14 | length 35
  TopLayer w0.095: v1(137.561,59.45) IC4.C14@138.061,58.95
  BottomLayer w0.095: C393.1@111.32,71.183 111.494,71.031 111.496,71.026 ccw(c111.584,71.062) 111.516,70.995 111.525,70.986 ccw(c111.592,71.053) 111.592,70.958 116.761,70.973 129.489,70.973 129.58,70.973 ccw(c129.605,71.064) 129.599,70.97 cw(c129.488,69.009) 130.796,70.473 ccw(c130.859,70.545) 130.811,70.463 130.876,70.398 ; 130.877,70.397 136.461,64.813 ccw(c136.541,64.864) 136.471,64.801 cw(c134.487,62.969) 137.152,63.399 ccw(c137.246,63.415) 137.152,63.398 cw(c135.317,63.042) 137.153,63.394 cw(c135.317,63.042) 137.186,63.042 137.186,59.175 137.301,59.061 137.505,59.061 137.561,59.117 v1(137.561,59.45)
S1C_TX_P: C157.1 IC4.D14 | length 35
  TopLayer w0.095: v1(137.561,58.45) IC4.D14@138.061,57.95
  BottomLayer w0.095: C157.1@111.32,70.511 111.494,70.664 111.496,70.668 cw(c111.584,70.632) 111.517,70.7 111.525,70.708 cw(c111.592,70.641) 111.593,70.736 116.761,70.751 129.488,70.751 cw(c129.488,69.009) 130.719,70.241 131.218,69.742 136.239,64.721 cw(c134.487,62.969) 136.964,62.969 136.964,59.083 137.209,58.839 137.505,58.839 137.561,58.783 v1(137.561,58.45)
S2_RX_N: C413.1 J5.9 | length 22.3
  TopLayer w0.095: J5.9@88.661,74.293 89.261,74.293 89.467,74.086 89.653,74.086 89.792,74.225 v6(89.861,74.225)
  BottomLayer w0.095: v6(89.861,74.225) 89.93,74.225 90.069,74.086 93.044,74.086 ccw(c93.141,74.183) 93.141,74.046 110.325,74.046 ccw(c110.325,74.195) 110.431,74.09 ccw(c110.402,74.118) 110.442,74.118 110.577,74.253 cw(c110.62,74.21) C413.1@110.62,74.271
S2_RX_P: C403.1 J5.11 | length 22.3
  TopLayer w0.095: J5.11@88.661,73.658 89.261,73.658 89.467,73.864 89.653,73.864 89.792,73.725 v6(89.861,73.725)
  BottomLayer w0.095: v6(89.861,73.725) 89.93,73.725 90.069,73.864 92.952,73.864 ccw(c93.049,73.961) 93.049,73.824 110.325,73.824 cw(c110.325,73.674) 110.431,73.78 cw(c110.402,73.751) 110.442,73.751 110.577,73.617 ccw(c110.62,73.659) C403.1@110.62,73.599
S2_TX_N: C414.2 J5.15 | length 22.3
  TopLayer w0.095: J5.15@88.661,72.388 89.261,72.388 89.467,72.181 89.653,72.181 89.792,72.32 v6(89.861,72.32)
  BottomLayer w0.095: v6(89.861,72.32) 89.93,72.32 90.069,72.181 95.422,72.181 ccw(c95.422,72.519) 95.661,72.28 ; 95.661,72.28 cw(c96.196,71.746) 96.196,72.502 110.325,72.502 ccw(c110.325,72.651) 110.431,72.546 ccw(c110.402,72.574) 110.442,72.574 110.577,72.709 cw(c110.62,72.667) C414.2@110.62,72.727
S2_TX_P: C405.2 J5.17 | length 22.3
  TopLayer w0.095: J5.17@88.661,71.753 89.261,71.753 89.467,71.959 89.653,71.959 89.792,71.82 v6(89.861,71.82)
  BottomLayer w0.095: v6(89.861,71.82) 89.93,71.82 90.069,71.959 95.423,71.959 ccw(c95.423,72.517) 95.818,72.123 ; 95.818,72.123 cw(c96.197,71.744) 96.197,72.28 110.325,72.28 cw(c110.325,72.131) 110.431,72.236 cw(c110.402,72.208) 110.442,72.208 110.577,72.073 ccw(c110.62,72.115) C405.2@110.62,72.055
S2C_RX_N: C413.2 IC4.C16 | length 39.1
  TopLayer w0.095: v1(139.561,59.45) IC4.C16@140.061,58.95
  BottomLayer w0.095: C413.2@111.32,74.271 cw(c111.32,74.21) 111.363,74.253 111.486,74.13 cw(c111.457,74.102) 111.497,74.102 111.525,74.074 ccw(c111.592,74.141) 111.592,74.046 129.524,74.046 cw(c129.524,71.29) 131.468,73.243 cw(c129.524,71.29) 131.472,73.239 132.14,72.571 138.379,66.332 cw(c136.431,64.383) 139.186,64.383 139.186,59.158 139.283,59.061 139.505,59.061 139.561,59.117 v1(139.561,59.45)
S2C_RX_P: C403.2 IC4.D16 | length 39.1
  TopLayer w0.095: v1(139.561,58.45) IC4.D16@140.061,57.95
  BottomLayer w0.095: C403.2@111.32,73.599 ccw(c111.32,73.659) 111.363,73.617 111.486,73.74 ccw(c111.457,73.768) 111.497,73.768 111.525,73.796 cw(c111.592,73.729) 111.592,73.824 129.521,73.824 cw(c129.521,71.284) 131.313,73.084 cw(c129.521,71.284) 131.317,73.08 138.029,66.368 138.221,66.176 cw(c136.424,64.38) 138.964,64.38 138.964,59.066 139.191,58.839 139.505,58.839 139.561,58.783 v1(139.561,58.45)
S2C_TX_N: C414.1 IC4.A15 | length 35.1
  TopLayer w0.095: v1(138.561,61.45) IC4.A15@139.061,60.95
  BottomLayer w0.095: C414.1@111.32,72.727 cw(c111.32,72.667) 111.363,72.709 111.486,72.586 cw(c111.457,72.558) 111.497,72.558 111.525,72.53 ccw(c111.592,72.597) 111.592,72.502 129.368,72.502 cw(c129.368,69.746) 131.316,71.695 137.354,65.657 cw(c135.405,63.708) 138.161,63.708 138.161,61.15 138.25,61.061 138.505,61.061 138.561,61.117 v1(138.561,61.45)
S2C_TX_P: C405.1 IC4.B15 | length 35.1
  TopLayer w0.095: v1(138.561,60.45) IC4.B15@139.061,59.95
  BottomLayer w0.095: C405.1@111.32,72.055 ccw(c111.32,72.115) 111.363,72.073 111.486,72.196 ccw(c111.457,72.224) 111.497,72.224 111.525,72.252 cw(c111.592,72.185) 111.592,72.28 129.365,72.28 cw(c129.365,69.74) 131.161,71.536 137.195,65.502 cw(c135.399,63.706) 137.939,63.706 137.939,61.058 138.158,60.839 138.505,60.839 138.561,60.783 v1(138.561,60.45)
S3_RX_N: C417.1 J5.33 | length 22.6
  TopLayer w0.095: J5.33@88.661,66.673 89.261,66.673 89.467,66.466 89.653,66.466 89.792,66.605 v6(89.861,66.605)
  BottomLayer w0.095: v6(89.861,66.605) 89.93,66.605 90.069,66.466 94.836,66.466 ccw(c94.836,69.006) 96.632,67.21 96.634,67.212 cw(c98.224,65.621) 96.635,67.213 cw(c98.224,65.621) 98.224,67.87 110.325,67.87 ccw(c110.325,68.02) 110.431,67.914 ccw(c110.402,67.943) 110.442,67.943 110.577,68.078 cw(c110.62,68.035) C417.1@110.62,68.095
S3_RX_P: C415.1 J5.35 | length 22.6
  TopLayer w0.095: J5.35@88.661,66.038 89.261,66.038 89.467,66.244 89.653,66.244 89.792,66.105 v6(89.861,66.105)
  BottomLayer w0.095: v6(89.861,66.105) 89.93,66.105 90.069,66.244 94.837,66.244 ccw(c94.837,69.003) 96.788,67.052 cw(c98.227,65.613) 96.789,67.053 cw(c98.227,65.613) 98.227,67.648 110.325,67.648 cw(c110.325,67.499) 110.431,67.605 cw(c110.402,67.576) 110.442,67.576 110.577,67.441 ccw(c110.62,67.484) C415.1@110.62,67.423
S3_TX_N: C418.2 J5.3 | length 22.4
  TopLayer w0.095: J5.3@88.661,76.198 89.261,76.198 89.467,75.991 89.653,75.991 89.792,76.13 v6(89.861,76.13)
  BottomLayer w0.095: v6(89.861,76.13) 89.93,76.13 90.069,75.991 98.315,75.991 cw(c98.315,75.3) 98.803,75.789 98.805,75.787 ccw(c99.281,76.263) 99.281,75.59 110.347,75.59 ccw(c110.347,75.685) 110.415,75.618 110.442,75.645 cw(c110.483,75.645) 110.454,75.674 110.577,75.797 cw(c110.62,75.754) C418.2@110.62,75.815
S3_TX_P: C416.2 J5.5 | length 22.4
  TopLayer w0.095: J5.5@88.661,75.563 89.261,75.563 89.467,75.769 89.653,75.769 89.792,75.63 v6(89.861,75.63)
  BottomLayer w0.095: v6(89.861,75.63) 89.93,75.63 90.069,75.769 98.313,75.769 cw(c98.313,75.294) 98.648,75.63 98.649,75.629 ccw(c99.28,76.259) 99.28,75.368 110.347,75.368 cw(c110.347,75.273) 110.415,75.34 110.442,75.312 ccw(c110.483,75.312) C416.2@110.454,75.283 ; C416.2@110.454,75.283 110.577,75.16 ccw(c110.62,75.203) C416.2@110.62,75.143
S3C_RX_N: C417.2 IC4.E17 | length 37.3
  TopLayer w0.095: v1(140.561,57.45) IC4.E17@141.061,56.95
  BottomLayer w0.095: C417.2@111.32,68.095 cw(c111.32,68.035) 111.363,68.078 111.486,67.955 cw(c111.457,67.926) 111.497,67.926 111.525,67.898 ccw(c111.592,67.965) 111.592,67.87 128.499,67.87 cw(c128.499,65.114) 130.448,67.063 134.519,62.992 cw(c132.969,61.442) 135.161,61.442 135.161,58.25 135.361,58.05 138.805,58.05 139.184,57.671 139.184,57.298 139.42,57.061 139.9,57.061 140.505,57.061 140.561,57.117 v1(140.561,57.45)
S3C_RX_P: C415.2 IC4.F17 | length 37.3
  TopLayer w0.095: v1(140.561,56.45) IC4.F17@141.061,55.95
  BottomLayer w0.095: C415.2@111.32,67.423 ccw(c111.32,67.484) 111.363,67.441 111.486,67.564 ccw(c111.457,67.593) 111.497,67.593 111.525,67.62 cw(c111.592,67.553) 111.592,67.648 128.497,67.648 cw(c128.497,65.108) 130.293,66.904 134.297,62.9 ; 134.298,62.899 cw(c132.747,61.35) 134.939,61.35 134.939,58.158 135.269,57.828 138.713,57.828 138.962,57.579 138.962,57.206 139.328,56.839 139.992,56.839 140.505,56.839 140.561,56.783 v1(140.561,56.45)
S3C_TX_N: C418.1 IC4.A17 | length 39.2
  TopLayer w0.095: v1(140.561,61.45) IC4.A17@141.061,60.95
  BottomLayer w0.095: C418.1@111.32,75.815 cw(c111.32,75.754) 111.363,75.797 111.486,75.674 cw(c111.457,75.645) 111.497,75.645 111.525,75.618 ccw(c111.592,75.685) 111.592,75.59 129.68,75.59 cw(c129.68,72.834) 131.628,74.783 133.123,73.288 139.376,67.035 cw(c137.488,65.148) 140.158,65.148 140.158,61.153 140.25,61.061 140.505,61.061 140.561,61.117 v1(140.561,61.45)
S3C_TX_P: C416.1 IC4.B17 | length 39.2
  TopLayer w0.095: v1(140.561,60.45) IC4.B17@141.061,59.95
  BottomLayer w0.095: C416.1@111.32,75.143 ccw(c111.32,75.203) 111.363,75.16 111.486,75.283 ccw(c111.457,75.312) 111.497,75.312 111.525,75.34 cw(c111.592,75.273) 111.592,75.368 129.677,75.368 cw(c129.677,72.828) 131.473,74.624 139.192,66.905 cw(c137.395,65.109) 139.193,66.904 cw(c137.395,65.109) 139.935,65.109 139.935,63.95 139.936,61.062 140.158,60.839 140.505,60.839 140.561,60.783 v1(140.561,60.45)
SERV1: IC27.9 R235.2 | length 3.2
  TopLayer w0.127: R235.2@107.853,69.071 108.532,69.071 108.784,69.323 108.784,70.148 108.997,70.361 IC27.9@110.047,70.361
SERV2: IC27.7 R233.2 | length 2.7
  TopLayer w0.127: R233.2@107.853,70.928 108.423,70.928 108.561,71.066 108.561,71.336 108.886,71.661 IC27.7@110.047,71.661
SERV3: IC27.6 R232.2 | length 2.4
  TopLayer w0.127: R232.2@107.853,71.857 108.459,71.857 108.913,72.311 IC27.6@110.047,72.311
SERV4: IC27.8 R234.2 | length 2.8
  TopLayer w0.127: R234.2@107.853,70 108.326,70 108.474,70.148 108.474,70.505 108.98,71.011 IC27.8@110.047,71.011
SERV5: IC27.5 R229.2 | length 2.3
  TopLayer w0.127: R229.2@107.853,72.786 108.008,72.941 110.028,72.941 IC27.5@110.047,72.961
SERV6: IC27.2 R221.2 | length 2.6
  TopLayer w0.127: R221.2@107.853,75.571 108.423,75.571 108.561,75.433 108.561,75.133 108.784,74.911 IC27.2@110.047,74.911
SERV7: IC27.3 R224.2 | length 2.4
  TopLayer w0.127: R224.2@107.853,74.643 108.532,74.643 108.914,74.261 IC27.3@110.047,74.261
SERV8: IC27.4 R228.2 | length 2.3
  TopLayer w0.127: R228.2@107.853,73.714 107.998,73.569 110.006,73.569 IC27.4@110.047,73.611
SERV_1: IC34.21 IC38.4 R235.1 | length 7.9
  TopLayer w0.127: IC38.4@100.197,69.386 102.342,69.386 103.142,70.186 IC34.21@104.747,70.186 105.799,70.186 106.136,69.849 106.136,69.201 106.265,69.071 R235.1@106.913,69.071
SERV_2: IC34.23 IC38.6 R233.1 | length 7.3
  TopLayer w0.127: IC38.6@100.197,70.686 102.156,70.686 102.956,71.486 IC34.23@104.747,71.486 104.821,71.412 105.799,71.412 106.086,71.125 106.283,70.928 R233.1@106.913,70.928
SERV_3: IC34.24 IC38.7 R232.1 | length 7.2
  TopLayer w0.127: IC38.7@100.197,71.336 102.103,71.336 102.903,72.136 IC34.24@104.747,72.136 105.849,72.136 106.128,71.857 R232.1@106.913,71.857
SERV_4: IC34.22 IC38.5 R234.1 | length 7.5
  TopLayer w0.127: IC38.5@100.197,70.036 102.253,70.036 103.053,70.836 IC34.22@104.747,70.836 104.785,70.798 105.84,70.798 106.206,70.432 106.206,70.203 106.409,70 R234.1@106.913,70
SERV_5: IC34.25 IC38.8 R229.1 | length 7
  TopLayer w0.127: IC38.8@100.197,71.986 102.051,71.986 102.851,72.786 IC34.25@104.747,72.786 R229.1@106.913,72.786
SERV_6: IC34.5 IC38.17 R221.1 | length 21.6
  TopLayer w0.127: IC34.5@97.747,72.136 94.447,72.136 IC38.17@94.297,71.986 93.261,71.986 93,72.247 93,74.644 93.927,75.571 R221.1@106.913,75.571
SERV_7: IC34.27 IC38.10 R224.1 | length 7.3
  TopLayer w0.127: IC38.10@100.197,73.286 101.735,73.286 102.535,74.085 104.747,74.085 105.947,74.086 106.504,74.643 R224.1@106.913,74.643
SERV_8: IC34.26 IC38.9 R228.1 | length 7.2
  TopLayer w0.127: IC38.9@100.197,72.636 101.842,72.636 102.642,73.436 IC34.26@104.747,73.436 105.999,73.436 106.278,73.714 R228.1@106.913,73.714
SERVMOD.1_SERVMOD: D4.4 IC27.11 J31.C5 R212.1 R239.2 | length 116.4
  TopLayer w0.127: R212.1@111.085,78.593 111.068,78.576 111.068,75.871 111.239,75.701 111.239,71.844 113.372,69.711 IC27.11@115.797,69.711 119.016,69.711 120.237,70.932 120.237,74.109 121.228,75.1 125.211,75.1 128.121,72.19 141.358,72.19 142.155,72.987 143.089,72.987 R239.2@143.625,73.523 ; R239.2@143.625,73.543 R239.2@143.625,73.523 ; D4.4@147.971,73.25 147.982,73.239 147.982,72.746 147.611,72.375 144.772,72.375 R239.2@143.625,73.523 ; D4.4@147.982,73.296 v6(149.061,73.296)
  BottomLayer w0.127: v6@149.067,73.29 161.121,73.29 162.325,72.086 210.863,72.087 J31.C5@212,70.95
SERVMOD.2_SERVMOD: D4.3 IC27.13 J31.F5 R191.1 R249.2 | length 108.5
  TopLayer w0.127: R191.1@112.194,78.593 112.194,72.477 113.661,71.011 IC27.13@115.797,71.011 118.33,71.011 119.235,71.916 119.235,74.064 120.914,75.743 126.797,75.743 128.02,74.52 141.331,74.52 142.012,75.201 143.169,75.201 143.625,74.746 143.625,74.719 143.851,74.492 144.007,74.492 145.249,73.25 D4.3@146.297,73.25 ; D4.3@146.451,73.25 D4.3@146.297,73.25 ; v6(146.46,72.792) 146.46,73.163 146.373,73.25 D4.3@146.297,73.25
  BottomLayer w0.127: v6(146.46,72.792) 146.479,72.812 148.674,72.812 149.636,71.85 151.661,71.85 206.9,71.85 J31.F5@207.8,70.95
SERVMOD.3_SERVMOD: D4.1 IC27.14 J31.I5 R182.1 R290.2 | length 104.6
  TopLayer w0.127: R182.1@112.672,76.689 112.672,73.298 114.309,71.661 115.947,71.661 118.039,71.661 118.726,72.348 118.726,74.084 120.636,75.994 127.617,75.994 128.495,75.116 138.526,75.116 139.062,75.652 140.678,75.652 R290.2@141.132,75.198 ; R290.2@141.132,75.178 R290.2@141.132,75.198 ; J31.I5@203.6,70.95 202.8,71.75 193.921,71.75 190.013,67.842 177.013,67.842 171.728,73.127 151.459,73.127 149.351,75.235 147.834,75.235 147.162,74.564 146.918,74.564 146.605,74.25 144.989,74.25 143.813,75.426 143.265,75.426 143.263,75.428 141.969,75.428 141.965,75.425 141.358,75.425 R290.2@141.132,75.198
SERVMOD.4_SERVMOD: D4.6 IC27.12 J31.L5 R192.1 R274.2 | length 103.4
  TopLayer w0.127: R192.1@111.684,76.689 111.684,72.347 113.666,70.365 IC27.12@115.793,70.365 ; IC27.12@115.797,70.361 115.808,70.371 118.581,70.371 119.661,71.451 119.661,74.078 121.053,75.47 125.602,75.47 127.827,73.245 140.468,73.245 141.132,73.908 R274.2@141.132,73.928 142.239,73.928 142.423,74.112 143.947,74.112 144.281,73.779 v1@144.281,73.559 ; v1(148.009,74.705) 148.009,74.336 148.09,74.256 148.117,74.256 148.093,74.256 149.505,74.256 150.936,72.825 171.449,72.825 176.851,67.424 190.273,67.424 193.799,70.95 J31.L5@199.4,70.95
  BottomLayer w0.127: v1(144.278,73.588) 145.394,74.705 v1(148.009,74.705)
SERVMOD.5_SERVMOD: D1.4 IC27.15 J31.A6 R181.1 R275.2 | length 116.7
  TopLayer w0.127: R181.1@113.245,78.593 113.154,78.501 113.154,73.543 114.386,72.311 115.947,72.311 117.798,72.311 118.339,72.851 118.339,74.161 120.505,76.326 128.016,76.326 128.164,76.179 138.554,76.179 138.823,75.909 141.576,75.909 142.05,76.383 143.171,76.383 143.625,75.929 R275.2@143.625,75.909 143.625,75.889 143.851,75.663 144.162,75.663 144.975,74.85 147.093,74.85 147.754,75.511 147.754,75.914 147.841,76 D1.4@147.971,76 148.356,75.615 148.625,75.615 148.655,75.585 148.956,75.585 148.986,75.615 149.696,75.615 151.874,73.437 172.144,73.437 177.339,68.242 189.695,68.242 193.603,72.15 214.1,72.15 J31.A6@214.9,72.95